# Altium PCB EMG_Arm_ELCT-V3.0.PcbDoc (part 1 of 3)
Units mil, origin at the board's own origin, x right, y up, seen from the top; angles counter-clockwise.
Board outline 8303.83 x 7532.25 mil, 2 copper layers (Top Layer, Bottom Layer), stack 3.556 mil thick; 104 components, 76 nets, 393 pads, 162 vias.
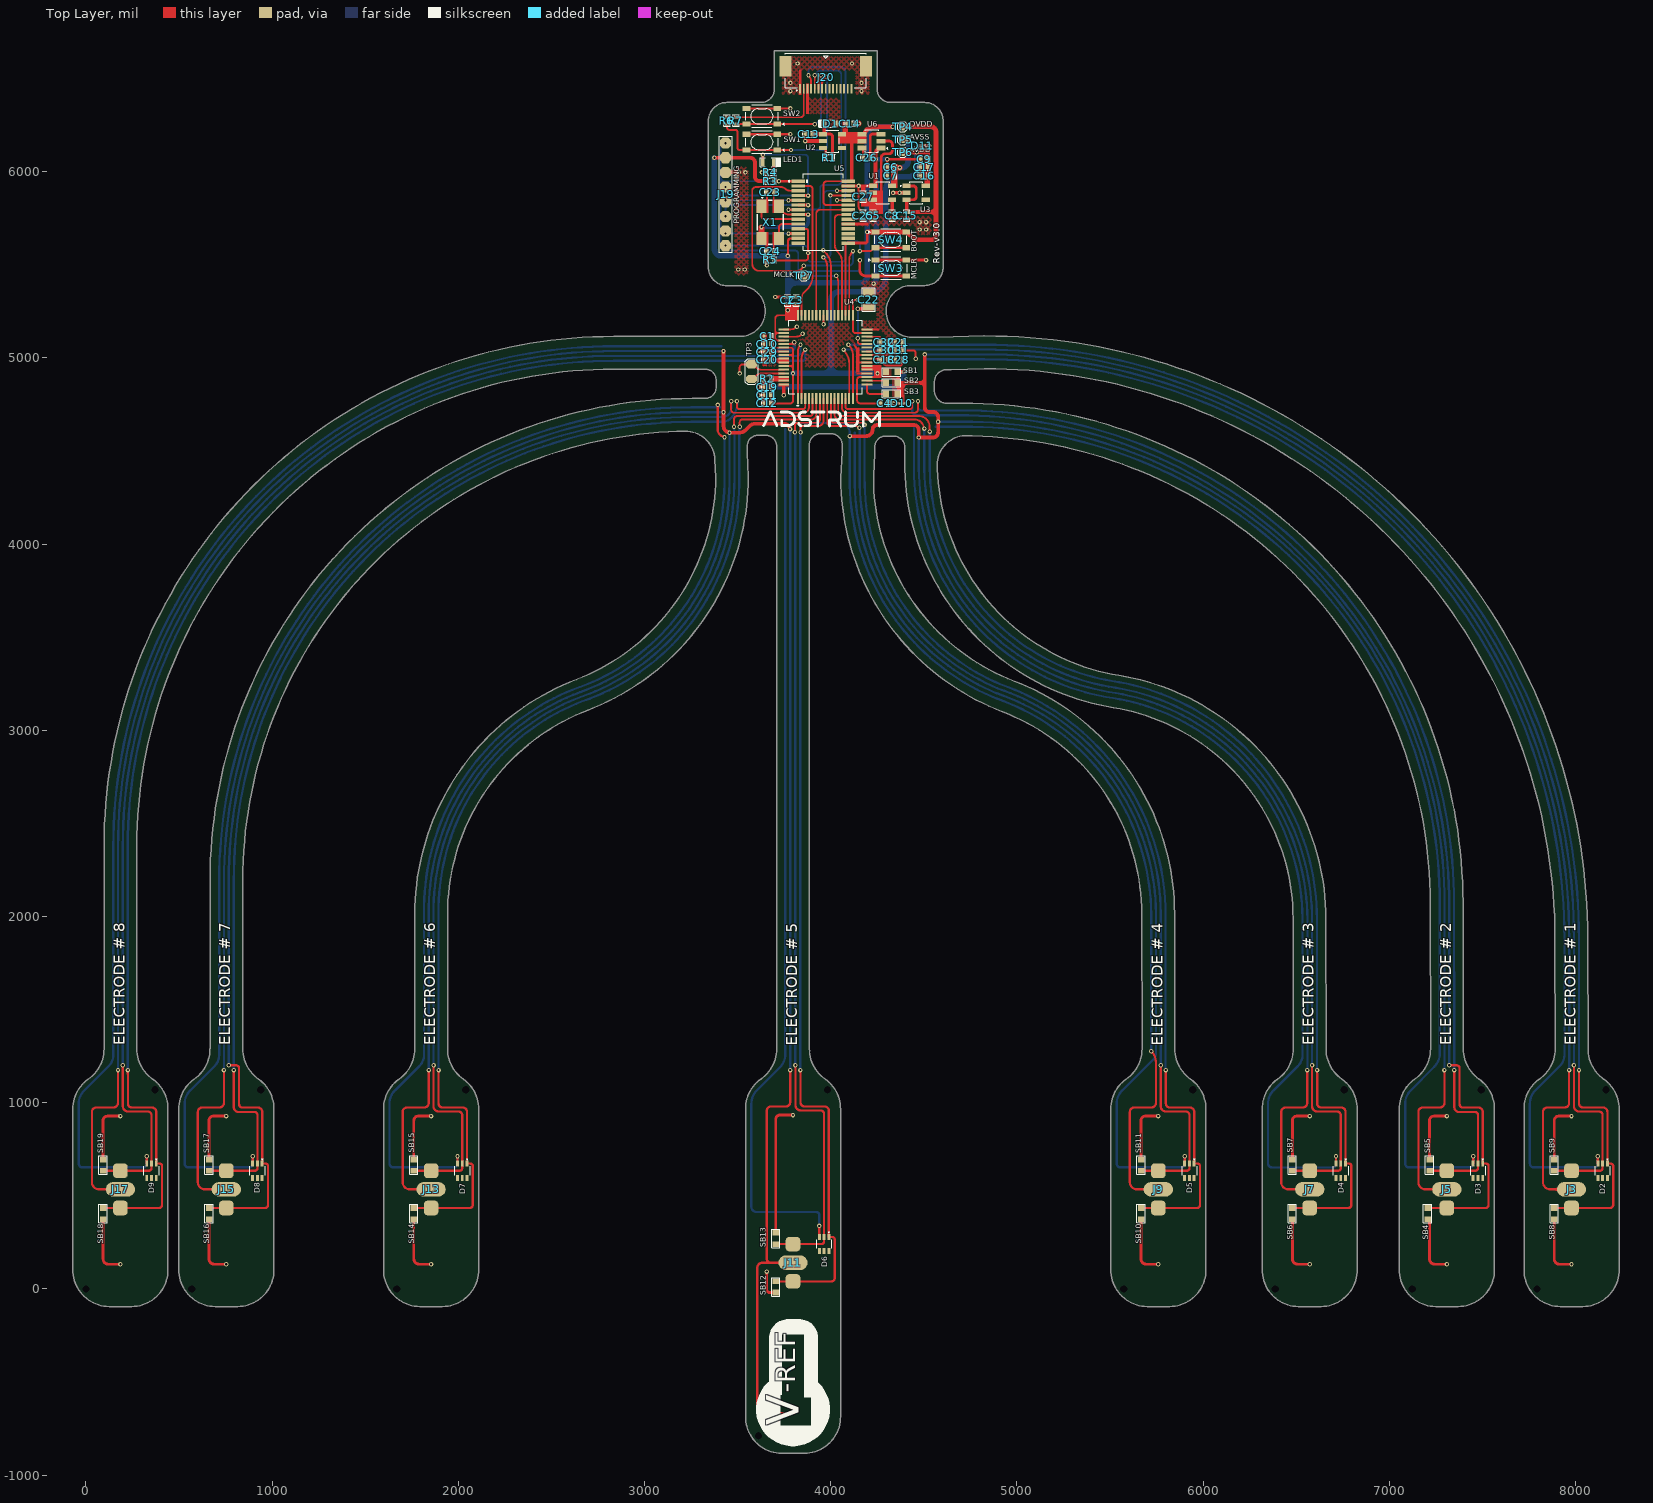
[diagram p0: Top Layer view]
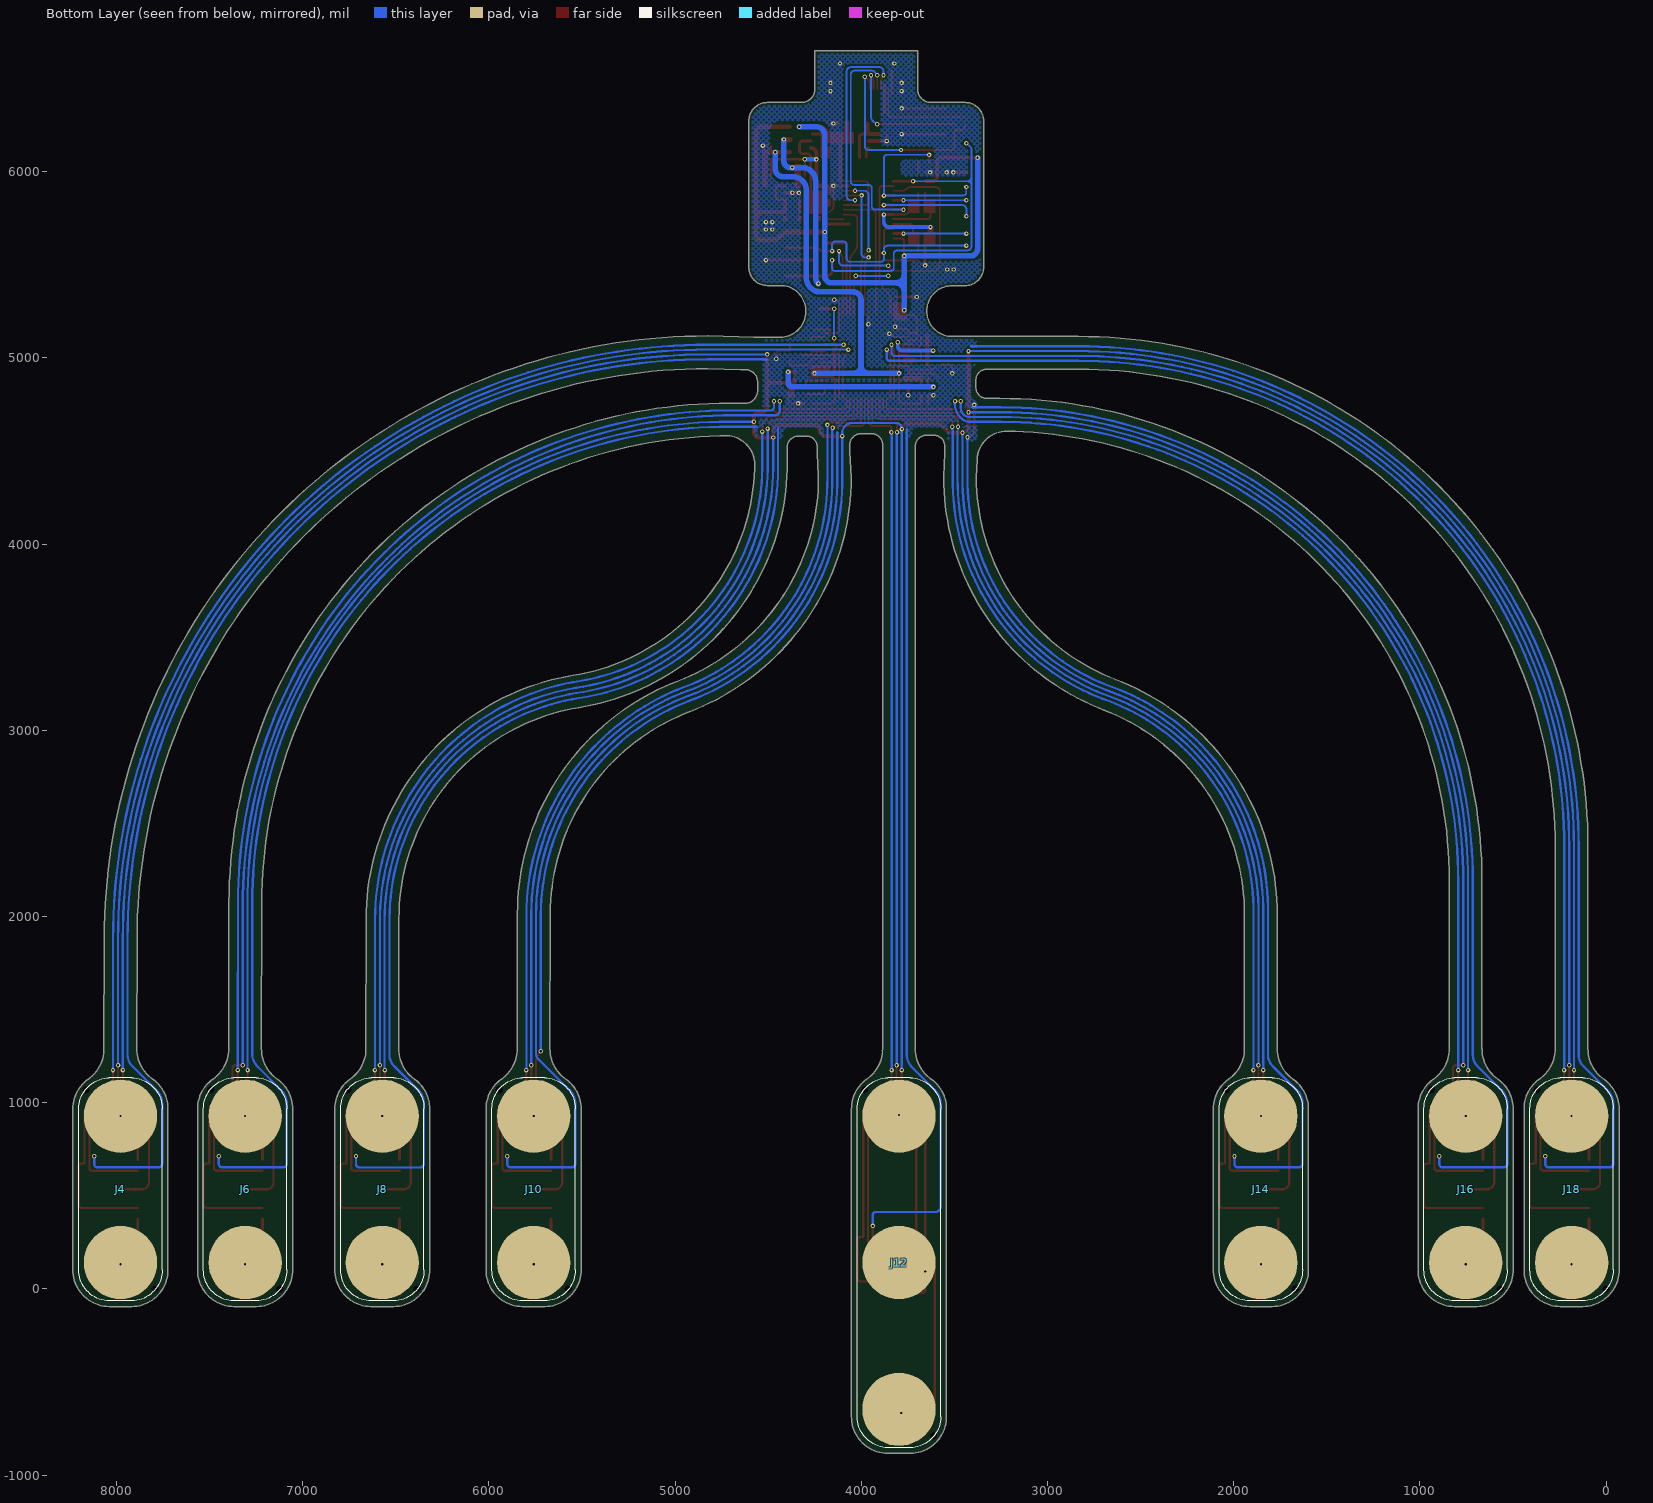
[diagram p1: Bottom Layer view, seen from below]
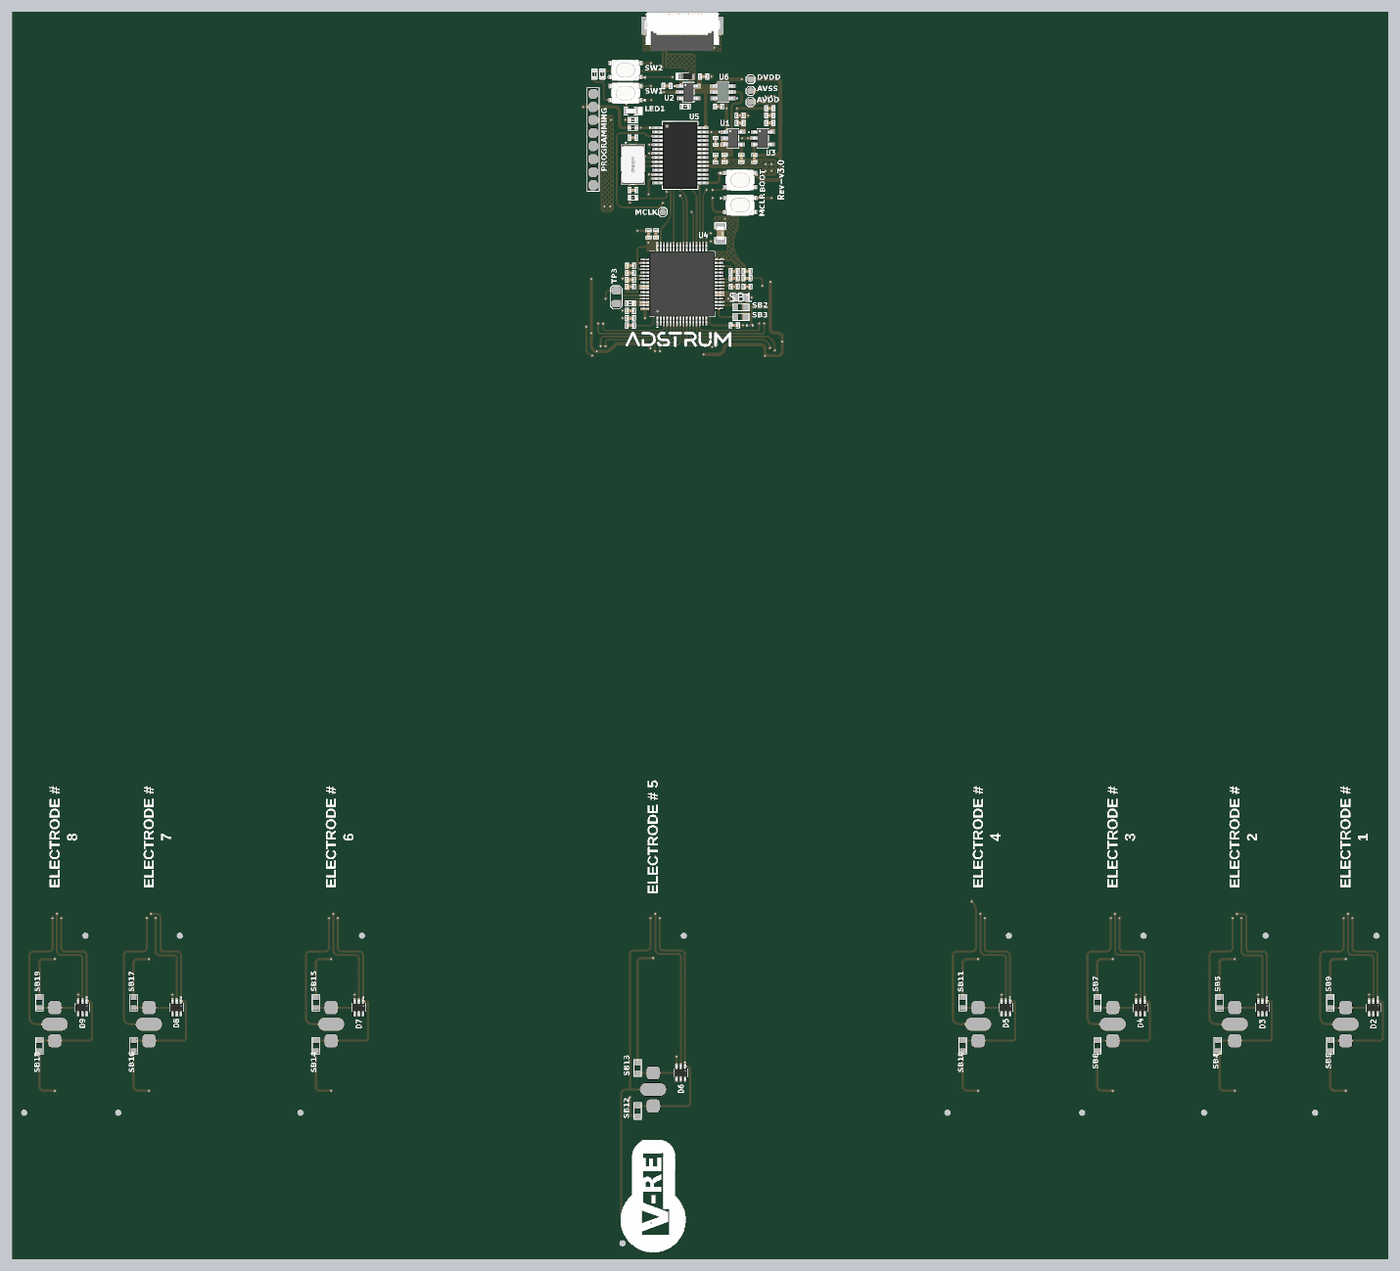
[diagram p3: 3D render of the assembled board from above, using the file's embedded part models]

## Layer stack, top to bottom
Top Solder: solder mask 0.5, Solder Resist, Dk 3.5
Top Layer: signal copper 1.378
Dielectric 1: dielectric 0.8, Flex, Dk 4.8
Bottom Layer: signal copper 1.378
Bottom Solder: solder mask 0.5, Solder Resist, Dk 3.5

## Board outline
-70,104.26 ccw(c126.84,102.05) 124.63,-94.79 245.86,-94.79 ccw(c243.65,102.05) 440.49,104.26 440.49,964.73 ccw(c243.67,966.94) 358.69,1126.66 358.63,1126.58 cw(c470.07,1288.83) 273.25,1291.04 273.24,1291.04 273.24,2378.83 cw(c2834.23,2378.83) 2834.29,4939.83 3325.21,4939.83 cw(c3325.21,4880.77) 3384.26,4880.77 3384.26,4841.93 cw(c3325.21,4841.93) 3325.21,4782.87 3255.48,4782.87 ccw(c3255.52,2193.58) 666.23,2193.58 666.23,1291.04 666.22,1291.04 cw(c469.4,1288.83) 580.84,1126.58 580.79,1126.66 ccw(c695.8,966.94) 498.98,964.73 498.98,104.27 ccw(c695.82,102.05) 693.6,-94.79 814.84,-94.79 ccw(c812.63,102.05) 1009.47,104.26 1009.46,964.73 ccw(c812.65,966.94) 927.66,1126.66 927.61,1126.58 cw(c1039.05,1288.83) 842.23,1291.04 842.22,1291.04 842.22,2193.58 cw(c3255.52,2193.58) 3128.55,4603.55 cw(c3234.74,2193.71) 3219.49,4605.84 cw(c3220.49,4448.36) 3377.84,4454.78 3381.76,4358.72 cw(c2215.67,4361.9) 2632.93,3273.02 ccw(c3116.02,2012.41) 1766.02,2012.44 1766.02,1291.04 1766,1291.04 cw(c1569.19,1288.83) 1680.63,1126.58 1680.57,1126.66 ccw(c1795.58,966.94) 1598.77,964.73 1598.76,104.27 ccw(c1795.6,102.05) 1793.39,-94.79 1914.62,-94.79 ccw(c1912.41,102.05) 2109.25,104.26 2109.25,964.73 ccw(c1912.43,966.94) 2027.45,1126.66 2027.39,1126.58 cw(c2138.83,1288.83) 1942.01,1291.04 1942,1291.04 1942,2012.44 cw(c3116.02,2012.41) 2695.9,3108.69 ccw(c2215.67,4361.9) 3557.75,4360.43 3557.75,4362.18 3552.54,4489.77 3552.13,4533.39 cw(c3610.76,4526.35) 3610.76,4585.41 3650.17,4585.41 cw(c3650.17,4526.35) 3708.8,4533.39 3709.22,4531.82 3709.22,4526.82 3709.22,4526.35 3709.22,4510.82 3709.49,1291.04 cw(c3512.67,1288.83) 3624.11,1126.58 3624.05,1126.66 ccw(c3739.07,966.94) 3542.25,964.73 3542.24,-684.15 ccw(c3739.08,-686.36) 3736.87,-883.2 3858.1,-883.2 ccw(c3855.89,-686.36) 4052.73,-684.15 4052.73,964.73 ccw(c3855.92,966.94) 3970.93,1126.66 3970.87,1126.6 cw(c4082.29,1288.82) 3885.5,1291.03 3885.21,4497.17 3885.21,4536.86 3885.63,4540.8 cw(c3944.26,4533.75) 3944.26,4592.81 4002.22,4592.81 cw(c4002.22,4533.75) 4060.85,4540.8 4060.53,4497.17 4052.73,4357.28 4052.76,4354.28 ccw(c5409.7,4366.62) 4922.45,3100.12 4922.56,3100.07 cw(c4505.83,2012.62) 5670.39,2014.6 5671.65,1291.04 cw(c5474.84,1288.83) 5586.28,1126.58 5586.22,1126.66 ccw(c5701.23,966.94) 5504.42,964.73 5504.41,104.27 ccw(c5701.25,102.05) 5699.04,-94.79 5820.27,-94.79 ccw(c5818.06,102.05) 6014.9,104.26 6014.9,964.73 ccw(c5818.08,966.94) 5933.1,1126.66 5933.04,1126.58 cw(c6044.48,1288.83) 5847.66,1291.04 5847.64,1291.04 5846.38,2014.91 ccw(c4505.83,2012.62) 4985.54,3264.41 cw(c5409.7,4366.62) 4250.32,4141.6 cw(c5418.61,4362.09) 4229.7,4362.09 4229.73,4370.52 4236.1,4484.91 4236.1,4521.26 cw(c4295.15,4521.26) 4295.15,4580.31 4338.1,4580.31 cw(c4338.1,4521.26) 4397.15,4521.26 4397.15,4477.64 4397.05,4477.64 4396.52,4440.26 ccw(c5732.96,4440.77) 5518.25,3121.69 cw(c5333.55,1987.03) 6483.14,1989.04 6484.36,1291.03 cw(c6287.55,1288.82) 6398.99,1126.58 6398.93,1126.66 ccw(c6513.95,966.93) 6317.13,964.72 6317.12,104.26 ccw(c6513.96,102.05) 6511.75,-94.79 6632.98,-94.79 ccw(c6630.77,102.05) 6827.61,104.26 6827.61,964.72 ccw(c6630.79,966.93) 6745.81,1126.66 6745.75,1126.58 cw(c6857.19,1288.82) 6660.37,1291.03 6660.35,1291.04 6659.13,1989.35 ccw(c5333.55,1987.03) 5546.52,3295.39 cw(c5732.97,4440.76) 4572.52,4440.33 cw(c4729.33,4425.89) 4706,4581.63 cw(c4706.54,2068.44) 7219.73,2072.88 7221.11,1291.04 cw(c7024.3,1288.83) 7135.74,1126.58 7135.68,1126.67 ccw(c7250.69,966.94) 7053.88,964.73 7053.87,104.27 ccw(c7250.71,102.05) 7248.5,-94.78 7369.73,-94.78 ccw(c7367.52,102.05) 7564.36,104.26 7564.36,964.73 ccw(c7367.54,966.94) 7482.56,1126.66 7482.5,1126.58 cw(c7593.94,1288.83) 7397.12,1291.04 7397.1,1291.05 7395.72,2073.19 ccw(c4706.54,2068.44) 4705.96,4757.61 4705.96,4757.63 4647.3,4756.67 4618.94,4756.67 cw(c4625.02,4824.72) 4556.7,4824.72 4556.7,4869.66 cw(c4625.02,4869.66) 4619.1,4937.72 4647.3,4937.72 4825.22,4942.26 cw(c4824.92,1877.62) 7889.55,1882.97 7890.59,1291.04 cw(c7693.77,1288.83) 7805.21,1126.58 7805.15,1126.66 ccw(c7920.17,966.94) 7723.35,964.72 7723.35,104.27 ccw(c7920.19,102.05) 7917.97,-94.79 8039.21,-94.79 ccw(c8037,102.05) 8233.83,104.26 8233.83,964.72 ccw(c8037.01,966.93) 8152.03,1126.66 8151.74,1126.74 cw(c8261.29,1286.23) 8067.9,1280.27 8065.54,1883.28 ccw(c4824.92,1877.62) 4824.02,5118.25 4822.96,5118.25 4578.3,5112.01 4434.22,5112.01 cw(c4434.22,5248.13) 4298.1,5248.13 cw(c4434.13,5253.04) 4434.13,5389.16 4474.13,5389.16 4505.79,5389.16 ccw(c4505.79,5486.35) 4574.52,5417.62 ccw(c4503.84,5488.3) 4603.79,5488.3 4603.79,6272.28 ccw(c4503.75,6272.28) 4574.49,6343.03 ccw(c4503.81,6272.35) 4503.81,6372.3 4321.09,6372.3 cw(c4321.09,6443.82) 4249.58,6443.82 4249.58,6649.05 3696.9,6649.05 3696.9,6443.82 cw(c3625.39,6443.82) 3625.39,6372.3 3442.67,6372.3 ccw(c3442.67,6272.35) 3371.99,6343.03 ccw(c3442.74,6272.28) 3342.69,6272.28 3342.69,5488.3 ccw(c3442.64,5488.3) 3371.97,5417.62 ccw(c3443.37,5489.03) 3443.37,5388.05 3512.26,5388.05 cw(c3512.26,5251.93) 3648.38,5251.93 cw(c3512.26,5251.93) 3512.26,5115.81 2834.29,5115.81 ccw(c2834.23,2378.83) 97.26,2378.83 97.25,1291.04 97.24,1291.04 cw(c-99.57,1288.83) 11.87,1126.58 11.81,1126.66 ccw(c126.82,966.94) -69.99,964.73

## Design rules (kind name [scope] priority, off if disabled: settings)
BoardOutlineClearance [All] p1: gap=0 ignorepadtopadclearanceinfootprint=FALSE except(7: Track-OutlineEdge; 10: Arc-OutlineEdge SMDPad-OutlineEdge THPad-OutlineEdge Via-OutlineEdge Fill-OutlineEdge Poly-OutlineEdge Region-OutlineEdge Text-OutlineEdge)
Clearance [All] p1: gap=7 ignorepadtopadclearanceinfootprint=FALSE except(5: SMDPad-SMDPad SMDPad-Fill; 10: Arc-Poly Track-Poly SMDPad-Poly THPad-Poly Via-Poly Fill-Poly Poly-Poly)
ComponentClearance [All] p1: gap=0 collisioncheckmode=3 verticalgap=0 showdistances=FALSE
MinimumSolderMaskSliver [All] p1: minsoldermaskwidth=0
PolygonConnect [All] p1: connectstyle=Direct reliefconductorwidth=10 reliefentries=4 polygonreliefangle="90 Angle" airgapwidth=10
RoutingVias [All] p1: holewidth=11.81 width=23.62 viastyle="Through Hole" minholewidth=7.87 minwidth=13.78 maxholewidth=31.5 maxwidth=62.99
SilkToSilkClearance [All] p1: silktosilkclearance=0
SilkToSolderMaskClearance [IsPad] p1: minsilkscreentomaskgap=0 clearancetoexposedcopper=TRUE
SolderMaskExpansion [All] p1: expansion=4 istentingtop=FALSE
SupplyNets "Schematic Supply Nets_4" [InNet('VCC_3V3')] p1: voltage=0.000
SupplyNets "Schematic Supply Nets_8" [InNet('DVDD')] p2: voltage=0.000
SupplyNets "Schematic Supply Nets_6" [InNet('+VBATT_RAW')] p3: voltage=0.000
SupplyNets "Schematic Supply Nets_5" [InNet('AGND')] p4: voltage=0.000
SupplyNets "Schematic Supply Nets_3" [InNet('-RAW')] p5: voltage=0.000
SupplyNets "Schematic Supply Nets_2" [InNet('AVDD')] p6: voltage=0.000
SupplyNets "Schematic Supply Nets_1" [InNet('AVSS')] p7: voltage=0.000
SupplyNets "Schematic Supply Nets" [InNet('VBATT')] p8: voltage=0.000
Width [All] p1: maxlimit=50 minlimit=10 preferedwidth=15 minimp=50.000000 maximp=50.000000 favimp=50.000000
26 further rules are at their usual default settings.

## Classes and differential pairs
component class Power_Sheet: C1 C2 C3 C4 C5 C6 C7 C8 C9 C10 C11 C12 C13 C14 C15 C16 C17 C26 C27 D1 D10 D11 R1 TP4 TP5 TP6 U1 U2 U3 U6
component class Pic_Sheet: C23 C24 C25 J19 J20 LED1 R3 R4 R5 R6 R7 SW1 SW2 SW3 SW4 U5 X1
component class Electrode_Sheet: D2 D3 D4 D5 D6 D7 D8 D9 J3 J4 J5 J6 J7 J8 J9 J10 J11 J12 J13 J14 J15 J16 J17 J18 SB4 SB5 SB6 SB7 SB8 SB9 SB10 SB11 SB12 SB13 SB14 SB15 SB16 SB17 SB18 SB19
component class AFE_SHEET: C18 C19 C20 C21 C22 C28 C29 C30 C31 C32 R2 SB1 SB2 SB3 TP3 TP7 U4

## Components (designator, comment, footprint, x,y, rotation, side; value= is the part's Value field where it differs from the comment)
C1 "1uF" Cap-0402 3660.21,5116.29 r0 top
C2 "0.1uF" Cap-0402 3769.38,5309.05 r270 top value=100nF
C3 "1uF" Cap-0402 3813.61,5309.05 r270 top
C4 "0.1uF" Cap-0402 4287.58,4755.86 r180 top value=100nF
C5 "2.2uF" Cap-0402 4228.79,5764.28 r270 top
C6 "10uF" Cap-0402 4322.24,6024.61 r0 top
C7 "2.2uF" Cap-0402 4322.24,5978.37 r180 top
C8 "0.01uF" Cap-0402 4330.09,5764.29 r270 top
C9 "1uF" Cap-0402 4502.23,6067.05 r0 top
C10 "0.1uF" Cap-0402 3660.21,5072.79 r0 top value=100nF
C11 "1uF" Cap-0402 3660.2,4799.56 r0 top
C12 "0.1uF" Cap-0402 3660.2,4755.56 r0 top value=100nF
C13 "2.2uF" Cap-0402 3880.74,6202.51 r180 top
C14 "2.2uF" Cap-0402 4102.26,6259.23 r0 top
C15 "2.2uF" Cap-0402 4407.71,5764.29 r270 top
C16 "2.2uF" Cap-0402 4502.23,5978.35 r180 top
C17 "10uF" Cap-0402 4502.23,6024.61 r0 top
C18 "0.1uF" Cap-0402 4286.88,4989.15 r0 top value=100nF
C19 "1nF" Cap-0402 3660.2,4843.9 r0 top
C20 "1uF" Cap-0402 3660.21,4989.5 r0 top
C21 "1uF" Cap-0402 4364.21,5083.41 r180 top
C22 "100uF" Cap-0805 4203.84,5313.68 r270 top
C23 "25pF" Cap-0402 3675.38,5889.35 r180 top
C24 "25pF" Cap-0402 3675.38,5573.05 r0 top
C25 "10uF" Cap-0402 4175.38,5764.11 r270 top
C26 "10uF" Cap-0402 4192.97,6076.61 r180 top
C27 "10uF" Cap-0402 4175.38,5867.07 r270 top
C28 "10uF" Cap-0402 4364.21,4989.38 r0 top
C29 "0.1uF" Cap-0402 3660.21,5031.38 r0 top value=100nF
C30 "1uF" Cap-0402 4286.89,5040.89 r180 top
C31 "0.1uF" Cap-0402 4364.21,5040.89 r180 top value=100nF
C32 "1uF" Cap-0402 4286.89,5083.4 r180 top
D1 "CDBU0130L" CDBU0130L-HF 3998.83,6259.23 r180 top
D2 "TPD4E1B06DCKR" SOT-363 8145.38,635 r270 top
D3 "TPD4E1B06DCKR" SOT-363 7475.9,635 r270 top
D4 "TPD4E1B06DCKR" SOT-363 6739.16,634.99 r270 top
D5 "TPD4E1B06DCKR" SOT-363 5926.45,635 r270 top
D6 "TPD4E1B06DCKR" SOT-363 3964.28,241.8 r270 top
D7 "TPD4E1B06DCKR" SOT-363 2020.8,635 r270 top
D8 "TPD4E1B06DCKR" SOT-363 921.01,635 r270 top
D9 "TPD4E1B06DCKR" SOT-363 352.03,635 r270 top
D10 "ESD451DPLR" X2SON-2(0.3x0.6) 4381.31,4755.86 r180 top
D11 "ESD451DPLR" X2SON-2(0.3x0.6) 4492.72,6140.41 r0 top
J3 "Test Pad SMD 3 Pin" "Test Pad (SMD 3 Pin)" 7978.35,535 r180 top locked
J4 "EMG ELECTRODE" "EMG 2 PAD" 7978.35,535 r0 bottom locked
J5 "Test Pad SMD 3 Pin" "Test Pad (SMD 3 Pin)" 7308.87,535 r180 top locked
J6 "EMG ELECTRODE" "EMG 2 PAD" 7308.87,535 r0 bottom locked
J7 "Test Pad SMD 3 Pin" "Test Pad (SMD 3 Pin)" 6572.12,534.99 r180 top locked
J8 "EMG ELECTRODE" "EMG 2 PAD" 6572.12,534.99 r0 bottom locked
J9 "Test Pad SMD 3 Pin" "Test Pad (SMD 3 Pin)" 5759.41,535 r180 top locked
J10 "EMG ELECTRODE" "EMG 2 PAD" 5759.41,535 r0 bottom locked
J11 "Test Pad SMD 3 Pin" "Test Pad (SMD 3 Pin)" 3797.24,140.8 r180 top locked
J12 "Electrode Pads" "EMG 3 Pad" 3797.24,140.8 r0 bottom locked
J13 "Test Pad SMD 3 Pin" "Test Pad (SMD 3 Pin)" 1853.76,535 r180 top locked
J14 "EMG ELECTRODE" "EMG 2 PAD" 1853.76,535 r0 bottom locked
J15 "Test Pad SMD 3 Pin" "Test Pad (SMD 3 Pin)" 753.98,535 r180 top locked
J16 "EMG ELECTRODE" "EMG 2 PAD" 753.98,535 r0 bottom locked
J17 "Test Pad SMD 3 Pin" "Test Pad (SMD 3 Pin)" 185,535 r180 top locked
J18 "EMG ELECTRODE" "EMG 2 PAD" 185,535 r0 bottom locked
J19 "SMD PADS (1x8) 2.54mm" "SMD PADS (1x8) 2.54mm" 3435.38,6154.27 r270 top
J20 "8.01A0.015200" 8.01A0.015200 3973.24,6506.38 r180 top locked
LED1 "150060BS75000" LED-0603 3664.35,6051.79 r0 top
R1 "10K" Res-0402 3991.38,6076.61 r180 top
R2 "1M" Res-0402 3660.21,4888.78 r0 top value=1MR
R3 "470K" Res-0402 3675.37,5950.05 r180 top value=470kR
R4 "1K" Res-0402 3675.38,5996.68 r0 top
R5 "470K" Res-0402 3675.38,5528.09 r0 top value=470kR
R6 "10K" Res-0402 3442.67,6274.52 r90 top
R7 "10K" Res-0402 3490.38,6274.52 r90 top
SB1 "Solder Bridge 0603" "Solder Bridge" 4326.58,4924.78 r0 top
SB2 "Solder Bridge 0603" "Solder Bridge" 4326.58,4866.24 r180 top
SB3 "Solder Bridge 0603" "Solder Bridge" 4326.58,4807.19 r180 top
SB4 "Solder Bridge 0603" "Solder Bridge" 7205.38,405 r90 top
SB5 "Solder Bridge 0603" "Solder Bridge" 7215.9,665 r270 top
SB6 "Solder Bridge 0603" "Solder Bridge" 6479.16,404.99 r90 top
SB7 "Solder Bridge 0603" "Solder Bridge" 6479.16,664.99 r270 top
SB8 "Solder Bridge 0603" "Solder Bridge" 7885.38,405 r90 top
SB9 "Solder Bridge 0603" "Solder Bridge" 7885.38,665 r270 top
SB10 "Solder Bridge 0603" "Solder Bridge" 5666.45,405 r90 top
SB11 "Solder Bridge 0603" "Solder Bridge" 5666.45,665 r270 top
SB12 "Solder Bridge 0603" "Solder Bridge" 3704.28,10.8 r90 top
SB13 "Solder Bridge 0603" "Solder Bridge" 3704.28,270.8 r270 top
SB14 "Solder Bridge 0603" "Solder Bridge" 1760.8,405 r90 top
SB15 "Solder Bridge 0603" "Solder Bridge" 1760.8,665 r270 top
SB16 "Solder Bridge 0603" "Solder Bridge" 661.01,405 r90 top
SB17 "Solder Bridge 0603" "Solder Bridge" 661.01,665 r270 top
SB18 "Solder Bridge 0603" "Solder Bridge" 92.03,405 r90 top
SB19 "Solder Bridge 0603" "Solder Bridge" 92.03,665 r270 top
SW1 "PTS810SJK250SMTRLFS" "PTS810SJK250SMTR LFS" 3630.38,6159.27 r180 top
SW2 "PTS810SJK250SMTRLFS" "PTS810SJK250SMTR LFS" 3630.38,6298.05 r180 top
SW3 "PTS810SJK250SMTRLFS" "PTS810SJK250SMTR LFS" 4323.18,5483.05 r0 top
SW4 "PTS810SJK250SMTRLFS" "PTS810SJK250SMTR LFS" 4322.79,5634.02 r0 top
TP3 "2 Test Pad" "2 Test Pad" 3574.22,4887.13 r90 top
TP4 "TEST POINT 0.5mm Dia" "Test-point - 0.5mm" 4385.38,6242.31 r90 top
TP5 "TEST POINT 0.5mm Dia" "Test-point - 0.5mm" 4385.38,6173.05 r90 top
TP6 "TEST POINT 0.5mm Dia" "Test-point - 0.5mm" 4385.38,6104.88 r90 top
TP7 "TEST POINT 0.5mm Dia" "Test-point - 0.5mm" 3855.38,5441.05 r90 top
U1 "TPS72325DBVR" SOT-23-5 4278.9,5886.79 r0 top
U2 "MCP1754T-3302E/OT" SOT-23-5 4009.89,6165.11 r0 top
U3 "TLV70025QDDCRQ1" SOT-23-5 4458.89,5886.79 r0 top
U4 "ADS1299IPAG" "64-TQFP (10x10)" 3971.26,5005.85 r90 top locked
U5 "PIC32MX250F128B-I/SS" SSOP-28-208mil 3960.38,5783.05 r0 top
U6 "LM2664M6/NOPB" SOT-23-6 4218.97,6165.05 r180 top
X1 "8MHz" SMD6035-4P 3675.38,5727.93 r270 top

## Footprints (in the part's own frame and the unit in brackets; to place one, negate y for a bottom-side part, rotate by r counter-clockwise, add the part's x,y. Pads: shape width x height; smd on the part's side, far side on the other; paste and mask are expansions set on the pad)
"2 Test Pad" [mil]
  oct 45x60 smd: 1(0,0) 2(78.74,0)
  silkscreen extent -29,-36 108,36
8.01A0.015200 [mm]
  rect 0.25x1.3 smd paste+0 mask+0.05: 1(3.5,1.54) 2(3,1.54) 3(2.5,1.54) 4(2,1.54) 5(1.5,1.54) 6(1,1.54) 7(0.5,1.54) 8(0,1.54) 9(-0.5,1.54) 10(-1,1.54) 11(-1.5,1.54) 12(-2,1.54) 13(-2.5,1.54) 14(-3,1.54) 15(-3.5,1.54)
  rect 1.6x2.8 smd paste+0 mask+0.05: MP1(-5.5,-1.54) MP2(5.5,-1.54)
  silkscreen extent -5.55,-3.33 5.55,1.86, body extent -5.8,-3.58 5.8,2.32, height 2.02
"64-TQFP (10x10)" [mm]
  rect 1.47x0.28 smd: 1(-5.67,3.75) 2(-5.67,3.25) 3(-5.67,2.75) 4(-5.67,2.25) 5(-5.67,1.75) 6(-5.67,1.25) 7(-5.67,0.75) 8(-5.67,0.25) 9(-5.67,-0.25) 10(-5.67,-0.75) 11(-5.67,-1.25) 12(-5.67,-1.75) 13(-5.67,-2.25) 14(-5.67,-2.75) 15(-5.67,-3.25) 16(-5.67,-3.75) 33(5.67,-3.75) 34(5.67,-3.25) 35(5.67,-2.75) 36(5.67,-2.25) 37(5.67,-1.75) 38(5.67,-1.25) 39(5.67,-0.75) 40(5.67,-0.25) 41(5.67,0.25) 42(5.67,0.75) 43(5.67,1.25) 44(5.67,1.75) 45(5.67,2.25) 46(5.67,2.75) 47(5.67,3.25) 48(5.67,3.75)
  rect 0.28x1.47 smd: 17(-3.75,-5.67) 18(-3.25,-5.67) 19(-2.75,-5.67) 20(-2.25,-5.67) 21(-1.75,-5.67) 22(-1.25,-5.67) 23(-0.75,-5.67) 24(-0.25,-5.67) 25(0.25,-5.67) 26(0.75,-5.67) 27(1.25,-5.67) 28(1.75,-5.67) 29(2.25,-5.67) 30(2.75,-5.67) 31(3.25,-5.67) 32(3.75,-5.67) 49(3.75,5.67) 50(3.25,5.67) 51(2.75,5.67) 52(2.25,5.67) 53(1.75,5.67) 54(1.25,5.67) 55(0.75,5.67) 56(0.25,5.67) 57(-0.25,5.67) 58(-0.75,5.67) 59(-1.25,5.67) 60(-1.75,5.67) 61(-2.25,5.67) 62(-2.75,5.67) 63(-3.25,5.67) 64(-3.75,5.67)
  silkscreen extent -6.68,-5 5,5, body extent -5.99,-5.99 5.99,5.99, height 1.2
Cap-0402 [mil]
  rect 18x25 smd mask+2.36: 1(-18.5,0) 2(18.5,0)
  silkscreen extent -31,-16 31,16, body extent -20,-10 20,10, height 19
Cap-0805 [mil] "SMD 0805"
  rect 40x60 smd mask+2.76: 1(-40,0) 2(40,0)
  silkscreen extent -64,-34 64,34, body extent -39,-25 39,25, height 30
CDBU0130L-HF [mm]
  rect 0.6x0.8 smd: 1(-0.85,0) 2(0.85,0)
  silkscreen extent -0.3,-0.51 1.68,0.51, body extent -0.85,-0.45 0.85,0.45, height 0.78
"EMG 2 PAD" [mm]
  round 10 smd: 1(0,-9.987) 2(0,9.987)
  silkscreen extent -5.68,-15.21 5.68,15.21
"EMG 3 Pad" [mm]
  round 10 smd: 1(0,-20) 2(0,-0.026) 3(0,20)
  silkscreen extent -5.68,-25.23 5.68,25.23
LED-0603 [mm]
  rect 0.5x1 smd: 1(-0.75,0) 2(0.75,0)
  silkscreen extent -1.12,-0.66 1.75,0.66, body extent -0.82,-0.37 0.82,0.36, height 0.68
"PTS810SJK250SMTR LFS" [mm]
  rect 1.05x0.7 smd: 1(-2.1,1.075) 2(2.1,1.075) 3(-2.1,-1.075) 4(2.1,-1.075)
  silkscreen extent -3.01,-1.55 2.2,1.52, body extent -2.35,-1.6 2.35,1.6, height 2.51
Res-0402 [mil]
  rect 18x25 smd mask+2.17: 1(-18.5,0) 2(18.5,0)
  silkscreen extent -32,-17 32,16, body extent -23,-11 23,11, height 16
SMD6035-4P [mm]
  rect 1.8x1.4 smd: 1(-2.2,-1.2) 2(2.2,-1.2) 3(2.2,1.2) 4(-2.2,1.2)
  silkscreen extent -3.4,-1.8 3,1.8, body extent -3,-1.8 3,1.8, height 1.2
"SMD PADS (1x8) 2.54mm" [mil]
  oct 60x60 smd: 1(0,0) 2(78.74,0) 3(157.48,0) 4(236.22,0) 5(314.96,0) 6(393.7,0) 7(472.44,0) 8(551.18,0)
  silkscreen extent -36,-36 588,36
"Solder Bridge" [mil] "Solder Bridge ON"
  rect 30x35 smd: 1(-30,0) 2(30,0)
  silkscreen extent -50,-22 50,22
SOT-23-5 [mm]
  rect 1.1x0.6 smd: 1(-1.3,0.95) 2(-1.3,0) 3(-1.3,-0.95) 4(1.3,-0.95) 5(1.3,0.95)
  silkscreen extent -2.13,-1.5 0.88,1.5, body extent -1.4,-1.45 1.4,1.45, height 1.45
SOT-23-6 [mm]
  rect 1.22x0.62 smd: 1(-1.31,0.95) 2(-1.31,0) 3(-1.31,-0.95) 4(1.31,-0.95) 5(1.31,0) 6(1.31,0.95)
  silkscreen extent -2.18,-1.52 0.86,1.52, body extent -1.5,-1.5 1.5,1.5, height 1.47
SOT-363 [mm]
  rect 0.8x0.4 smd: 1(-0.97,0.65) 2(-0.97,0) 3(-0.97,-0.65) 4(0.97,-0.65) 5(0.97,0) 6(0.97,0.65)
  silkscreen extent -1.65,-1.07 0.6,1.07, body extent -1.15,-1.05 1.15,1.05, height 1
SSOP-28-208mil [mm]
  rect 1.85x0.45 smd: 1(-3.4,4.225) 2(-3.4,3.575) 3(-3.4,2.925) 4(-3.4,2.275) 5(-3.4,1.625) 6(-3.4,0.975) 7(-3.4,0.325) 8(-3.4,-0.325) 9(-3.4,-0.975) 10(-3.4,-1.625) 11(-3.4,-2.275) 12(-3.4,-2.925) 13(-3.4,-3.575) 14(-3.4,-4.225) 15(3.4,-4.225) 16(3.4,-3.575) 17(3.4,-2.925) 18(3.4,-2.275) 19(3.4,-1.625) 20(3.4,-0.975) 21(3.4,-0.325) 22(3.4,0.325) 23(3.4,0.975) 24(3.4,1.625) 25(3.4,2.275) 26(3.4,2.925) 27(3.4,3.575) 28(3.4,4.225)
  silkscreen extent -4.7,-5.21 2.72,5.21, body extent -3.88,-5.17 3.88,5.17, height 2.15
"Test Pad (SMD 3 Pin)" [mm]
  rrect50% 2x2 smd: 1(0,2.54) 3(0,-2.54)
  oval 4x2 smd: 2(0,0)
"Test-point - 0.5mm" [mm]
  oct 1x1 smd: 1(0,0)
  silkscreen extent -0.68,-0.68 0.68,0.68
X2SON-2(0.3x0.6) [mm]
  rect 0.28x0.25 smd paste+0 mask+0.05: 1(-0.22,0) 2(0.22,0)
  silkscreen extent -0.46,-0.15 0.46,0.13, body extent -0.3,-0.15 0.3,0.15, height 0.32

## Part data
C1 C3 C9 C11 C20 C21 C30 C32: library part CC0402KRX5R8BB105, "CAP CER 1UF 25V X5R 0402", Case Code (Imperial)=0402, Case Code (Metric)=1005, Dielectric=X5R, LCSC Part Number=C326568, Manufacturer=Yageo, Max Operating Temperature=85°C, Min Operating Temperature=-55°C, Package Quantity=10000, Supplier Part Number 1=603-CC402KRX5R8BB105, Tolerance=10%, Voltage Rating=25V, Capacitance=1uF, Case/Package=0402, Category="Ceramic Capacitors", ComponentLink1Description=http://www.mouser.com/ds/2/447/Yageo_UPY-GP_NP0_16V-to-50V_9-358835.pdf?src-supplier=Mouser, ComponentLink1URL=http://www.mouser.com/ds/2/447/Yageo_UPY-GP_NP0_16V-to-50V_9-358835.pdf?src-supplier=Mouser, ComponentLink2Description=http://www.yageo.com/documents/recent/UPY-GPHC_X5R_4V-to-50V_25.pdf?src-supplier=Digi-Key, ComponentLink2URL=http://www.yageo.com/documents/recent/UPY-GPHC_X5R_4V-to-50V_25.pdf?src-supplier=Digi-Key, ComponentLink3Description=https://4donline.ihs.com/images/VipMasterIC/IC/YAGO/YAGO-S-A0006851646/YAGO-S-A0006851646-1.pdf?hkey=6D3A4C79FDBF58556ACFDE234799DDF0&src-supplier=Newark, ComponentLink3URL=https://4donline.ihs.com/images/VipMasterIC/IC/YAGO/YAGO-S-A0006851646/YAGO-S-A0006851646-1.pdf?hkey=6D3A4C79FDBF58556ACFDE234799DDF0&src-supplier=Newark, Halogen Free="Halogen Free", Lead Free="Lead Free", Length=0.039inch, Manufacturer Part Number=CC0402KRX5R8BB105, Mount="Surface Mount", Packaging="Tape and Reel", Pricing 1="1=0.30000, 10=0.20400, 50=0.20400, 100=0.11600, 1000=0.07200, 10000=0.05900 (USD)", RoHS=Yes, RoHS Compliant=Yes, Stock 1=91975, Supplier 1=Mouser, Termination=SMD/SMT, Thickness=0.022inch, Voltage Rating (DC)=25V, Weight=2.3E-05oz, Width=0.02inch
C2 C4 C10 C12 C18 C29 C31: library part CC0402KRX7R7BB104, "CAP CER 0.1UF 16V X7R 0402", Case Code (Imperial)=0402, Case Code (Metric)=1005, Dielectric=X7R, LCSC Part Number=C60474, Manufacturer=Yageo, Max Operating Temperature=125°C, Min Operating Temperature=-55°C, Package Quantity=1, Temperature Coefficient=30ppm/°C, Tolerance=10%, Voltage=16V, Case/Package=0402, ComponentLink1Description=https://datasheet.ciiva.com/11788/0900766b80ce67ed-11788364.pdf?src-supplier=Rs, ComponentLink1URL=https://datasheet.ciiva.com/11788/0900766b80ce67ed-11788364.pdf?src-supplier=Rs, ComponentLink2Description=https://datasheet.ciiva.com/7978/1489800-7978111.pdf?src-supplier=Element14, ComponentLink2URL=https://datasheet.ciiva.com/7978/1489800-7978111.pdf?src-supplier=Element14, ComponentLink3Description=https://datasheet.ciiva.com/161/mlccorderingcode-161545.pdf?src-supplier=Digikey, ComponentLink3URL=https://datasheet.ciiva.com/161/mlccorderingcode-161545.pdf?src-supplier=Digikey, ComponentLink4Description=https://datasheet.ciiva.com/161/mlccorderingcode-161544.pdf?src-supplier=Digikey, ComponentLink4URL=https://datasheet.ciiva.com/161/mlccorderingcode-161544.pdf?src-supplier=Digikey, ComponentLink5Description=https://datasheet.ciiva.com/161/mlccorderingcode-161546.pdf?src-supplier=Digikey, ComponentLink5URL=https://datasheet.ciiva.com/161/mlccorderingcode-161546.pdf?src-supplier=Digikey, ComponentLink6Description=https://datasheet.ciiva.com/8033/1734573-8033661.pdf?src-supplier=Element14, ComponentLink6URL=https://datasheet.ciiva.com/8033/1734573-8033661.pdf?src-supplier=Element14, ComponentLink7Description=https://datasheet.ciiva.com/28450/1489800-28450335.pdf?src-supplier=Element14, ComponentLink7URL=https://datasheet.ciiva.com/28450/1489800-28450335.pdf?src-supplier=Element14, ComponentLink8Description=https://datasheet.ciiva.com/13395/upy-gphc-x7r-6-3v-to-50v-8-13395676.pdf?src-supplier=Mouser, ComponentLink8URL=https://datasheet.ciiva.com/13395/upy-gphc-x7r-6-3v-to-50v-8-13395676.pdf?src-supplier=Mouser, ComponentLink9Description=https://datasheet.ciiva.com/8033/1734573-8033663.pdf?src-supplier=Element14, ComponentLink9URL=https://datasheet.ciiva.com/8033/1734573-8033663.pdf?src-supplier=Element14, ComponentLink10Description=https://datasheet.ciiva.com/11587/upy-gphc-x7r-6-3v-to-50v-8-11587305.pdf?src-supplier=Avnet, ComponentLink10URL=https://datasheet.ciiva.com/11587/upy-gphc-x7r-6-3v-to-50v-8-11587305.pdf?src-supplier=Avnet, Depth=0.5mm, Halogen Free=5694HalogenFree, Height=0.5mm, Item Type=Capacitors, Lead Free=5697LeadFree, Length=1mm, Manufacturer Part Number=CC0402KRX7R7BB104, Material=4241ConductorMaterial, Mounting Technology="Surface Mount", Packaging="Tape and Reel", Pins=2, Pricing="10000=0.0021, 40000=0.002, 150000=0.0019, 250000=0.0019, 500000=0.0018 (USD)", Radiation Hardening=No, Reach SVHC Compliant=No, RoHS=Yes, RoHS Compliant=Yes, Series=CC, Stock=22130000, Supplier="Future Electronics", Termination=SMD/SMT, Thickness=0.022inch, Voltage Rating=16V, Voltage Rating (AC)=16V, Voltage Rating (DC)=16V, Width=0.02inch
C5 C7 C13 C14 C15 C16: library part C1005X5R1V225K050BC, "CAP CER 2.2UF 35V X5R 0402", Case Code (Imperial)=0402, Case Code (Metric)=1005, Dielectric=X5R, Dielectric Material=Ceramic, Manufacturer=TDK, Max Operating Temperature=85°C, Min Operating Temperature=-55°C, Package Quantity=1, Supplier Part Number=445-9028-1-ND, Tolerance=10%, Voltage Rating=35V, Case/Package=0402, ComponentLink1Description=https://datasheet.ciiva.com/24218/mlcc-commercial-general-en-24218938.pdf?src-supplier=Mouser, ComponentLink1URL=https://datasheet.ciiva.com/24218/mlcc-commercial-general-en-24218938.pdf?src-supplier=Mouser, Depth=0.5mm, Height=0.5mm, Item Type=Capacitors, Lead Free="Lead Free", Length=1mm, Manufacturer Part Number=C1005X5R1V225K050BC, Material=4241ConductorMaterial, Mounting Technology="Surface Mount", Packaging="Tape and Reel", Pricing="1=0.21, 10=0.123, 50=0.0866, 100=0.0754, 500=0.05646, 1000=0.05055, 2500=0.04429, 5000=0.04049 (USD)", Reach SVHC Compliant=Unknown, RoHS=Yes, RoHS Compliant=Yes, Series=C, Stock=1458755, Supplier=Digikey, Termination=SMD/SMT, Thickness=0.022inch, Voltage Rating (DC)=35V, Weight=2.3E-05oz, Width=0.02inch
C6 C17: library part CC0402MRX5R6BB106, "CAP CER 10UF 10V X5R 0402", Case Code (Imperial)=0402, Case Code (Metric)=1005, LCSC Part Number=C962143, Manufacturer=Yageo, Max Operating Temperature=85°C, Min Operating Temperature=-55°C, Supplier Part Number 1=6097631, Tolerance=20%, Voltage Rating=10V, Capacitance=10uF, Case/Package=0402, Category="Ceramic Capacitors", ComponentLink1Description=http://www.yageo.com/documents/recent/UPY-GPHC_X5R_4V-to-50V_25.pdf?src-supplier=Digi-Key, ComponentLink1URL=http://www.yageo.com/documents/recent/UPY-GPHC_X5R_4V-to-50V_25.pdf?src-supplier=Digi-Key, Item Type=Capacitor, Manufacturer Part Number=CC0402MRX5R6BB106, Mount="Surface Mount", Packaging="Tape and Reel", Pricing 1="10000=0.02650, 20000=0.02590, 30000=0.02550, 40000=0.02530, 50000=0.02450 (USD)", RoHS=Yes, RoHS Compliant=Yes, Stock 1=80000, Supplier 1="Future Electronics"
C8: library part CC0402KRX5R8BB103, "CAP CER 10000PF 25V X5R 0402", LCSC Part Number=C576726, Manufacturer=Yageo, Supplier Part Number 1=2101932, Category="Ceramic Capacitors", ComponentLink1Description=LCSC, ComponentLink1URL=https://www.lcsc.com/product-detail/Multilayer-Ceramic-Capacitors-MLCC-SMD-SMT_YAGEO-CC0402KRX5R8BB103_C576726.html, Item Type=Capacitor, Manufacturer Part Number=CC0402KRX5R8BB103, Pricing 1="10000=0.00290, 40000=0.00270, 150000=0.00260, 250000=0.00250, 500000=0.00240 (USD)", RoHS=Yes, RoHS Compliant=Yes, Stock 1=140000, Supplier 1="Future Electronics"
C19: library part CC0402KRX7R8BB102, "CAP CER 1000PF 25V X7R 0402", Case Code (Imperial)=0402, Case Code (Metric)=1005, Dielectric=X7R, Insulation Resistance=10GR, LCSC Part Number=C541372, Manufacturer=Yageo, Max Operating Temperature=125°C, Min Operating Temperature=-55°C, Tolerance=10%, Voltage Rating=25V, Capacitance=1nF, Case/Package=0402, Category="Ceramic Capacitors", ComponentLink1Description=https://datasheet.ciiva.com/26862/getdatasheetpartid-639817-26862638.pdf?src-supplier=Verical, ComponentLink1URL=https://datasheet.ciiva.com/26862/getdatasheetpartid-639817-26862638.pdf?src-supplier=Verical, ComponentLink2Description=https://datasheet.ciiva.com/5425/upy-gp-np0-16v-to-50v-8-3714-5425527.pdf?src-supplier=Mouser, ComponentLink2URL=https://datasheet.ciiva.com/5425/upy-gp-np0-16v-to-50v-8-3714-5425527.pdf?src-supplier=Mouser, Depth=0.5mm, Dissipation Factor=2.5%, Halogen Free="Halogen Free", Item Type=Capacitor, Lead Free="Lead Free", Length=1mm, Manufacturer Part Number=CC0402KRX7R8BB102, Mount="Surface Mount", Number of Pins=2, Packaging="Tape and Reel", Pricing 1="1=0.00230, 10000=0.00230, 100001=0.00190 (USD)", Radiation Hardening=No, RoHS=Yes, RoHS Compliant=Yes, Series=CC, Stock 1=370000, Supplier 1="Arrow Electronics", Supplier Part Number 1=CC0402KRX7R8BB102, Termination=SMD/SMT, Thickness=0.022inch, Voltage Rating (DC)=25V, Width=0.02inch
C22: library part GRM21BR60J107ME15L, "CAP CER 100UF 6.3V X5R 0805", Case Code (Imperial)=0805, Case Code (Metric)=2012, Dielectric=X5R, LCSC Part Number=C141660, Manufacturer=Murata, Max Operating Temperature=85°C, Min Operating Temperature=-55°C, Tolerance=20%, Voltage Rating=6.3V, Case/Package=0805, ComponentLink1Description=http://www.farnell.com/datasheets/1957830.pdf?src-supplier=Farnell, ComponentLink1URL=http://www.farnell.com/datasheets/1957830.pdf?src-supplier=Farnell, ComponentLink2Description=https://datasheet.octopart.com/GRM21BR60J107ME15L-Murata-datasheet-48012791.pdf?src-supplier=Element14, ComponentLink2URL=https://datasheet.octopart.com/GRM21BR60J107ME15L-Murata-datasheet-48012791.pdf?src-supplier=Element14, ComponentLink3Description=http://www.farnell.com/datasheets/1957830.pdf?src-supplier=Element14, ComponentLink3URL=http://www.farnell.com/datasheets/1957830.pdf?src-supplier=Element14, ComponentLink4Description=https://search.murata.co.jp/Ceramy/image/img/A01X/G101/ENG/GRM21BR60J107ME15-01.pdf?src-supplier=Digikey, ComponentLink4URL=https://search.murata.co.jp/Ceramy/image/img/A01X/G101/ENG/GRM21BR60J107ME15-01.pdf?src-supplier=Digikey, ComponentLink5Description=https://datasheet.octopart.com/GRM21BR60J107ME15L-Murata-datasheet-62287462.pdf?src-supplier=Future+Electronics, ComponentLink5URL=https://datasheet.octopart.com/GRM21BR60J107ME15L-Murata-datasheet-62287462.pdf?src-supplier=Future+Electronics, ComponentLink6Description=http://www.farnell.com/datasheets/1957830.pdf?src-supplier=Newark, ComponentLink6URL=http://www.farnell.com/datasheets/1957830.pdf?src-supplier=Newark, ComponentLink7Description=https://datasheet.octopart.com/GRM21BR60J107ME15L-Murata-datasheet-165579666.pdf?src-supplier=TME, ComponentLink7URL=https://datasheet.octopart.com/GRM21BR60J107ME15L-Murata-datasheet-165579666.pdf?src-supplier=TME, Height=1.45mm, Item Type=Capacitors, Lead Free="Lead Free", Length=0.079inch, Manufacturer Part Number=GRM21BR60J107ME15L, Material=4241ConductorMaterial, Mounting Technology="Surface Mount", Packaging="Cut Tape", Pricing="1=1.28, 10=0.697, 50=0.697, 100=0.633, 1000=0.485, 10000=0.384 (USD)", Reach SVHC Compliant=No, RoHS=Yes, RoHS Compliant=Yes, Series=GRM, Stock=94172, Supplier=Mouser, Thickness=0.057inch, Voltage Rating (DC)=6.3V, Width=0.049inch
C23 C24: library part CC0402JRNPO9BN250, "CAP CER 25PF 50V C0G/NPO 0402", Case/Package=0402, LCSC Part Number=C541363, Manufacturer=Yageo, Item Type=Capacitors, Manufacturer Part Number=CC0402JRNPO9BN250, Pricing="1=0.1, 10=0.02, 50=0.02, 100=0.012, 1000=0.01, 10000=0.007 (USD)", RoHS=Yes, Stock=230189, Supplier=Mouser
C25 C26 C27 C28: library part CL05A106MP5NUNC, "CAP CER 10UF 10V X5R 0402", Case Code (Imperial)=0402, Case Code (Metric)=1005, Dielectric=X5R, LCSC Part Number=C315248, Manufacturer=Samsung, Max Operating Temperature=85°C, Min Operating Temperature=-55°C, Package Quantity=1, Tolerance=20%, Voltage Rating=10V, Capacitance=10uF, Case/Package=0402, Category="Ceramic Capacitors", ComponentLink1Description=https://datasheet.ciiva.com/25721/cl05a106mp5nunc-25721584.pdf?src-supplier=Digi-Key, ComponentLink1URL=https://datasheet.ciiva.com/25721/cl05a106mp5nunc-25721584.pdf?src-supplier=Digi-Key, ComponentLink2Description=https://datasheet.ciiva.com/26838/getdatasheetpartid-745310-26838170.pdf?src-supplier=Verical, ComponentLink2URL=https://datasheet.ciiva.com/26838/getdatasheetpartid-745310-26838170.pdf?src-supplier=Verical, Construction=Flat, Contact Plating=Tin, Depth=0.5mm, Item Type=Capacitor, Lead Free="Lead Free", Length=1mm, Manufacturer Part Number=CL05A106MP5NUNC, Mount="Surface Mount", Packaging="Tape and Reel", Pricing 1="10000=0.02537 (USD)", Radiation Hardening=No, RoHS=Yes, RoHS Compliant=Yes, Series=CL, Stock 1=1729850, Supplier 1=Avnet, Supplier Part Number 1=CL05A106MP5NUNC, Termination=Wraparound, Thickness=0.028inch, Width=0.02inch
D1: "DIODE SCHOTTKY 30V 100MA 0603C", LCSC Part Number=C2886023, Manufacturer=Comchip, ComponentLink1Description=https://datasheet.ciiva.com/4716/cdbu0130l-reva791956-41311-4716064.pdf?src-supplier=Mouser, ComponentLink1URL=https://datasheet.ciiva.com/4716/cdbu0130l-reva791956-41311-4716064.pdf?src-supplier=Mouser, ComponentLink2Description=https://datasheet.ciiva.com/912/cdbu0130l-reva791956-912529.pdf?src-supplier=Digikey, ComponentLink2URL=https://datasheet.ciiva.com/912/cdbu0130l-reva791956-912529.pdf?src-supplier=Digikey, ComponentLink3Description=https://datasheet.ciiva.com/912/cdbu0130l-reva791956-912530.pdf?src-supplier=Digikey, ComponentLink3URL=https://datasheet.ciiva.com/912/cdbu0130l-reva791956-912530.pdf?src-supplier=Digikey, ComponentLink4Description=https://datasheet.ciiva.com/912/cdbu0130l-reva791956-912531.pdf?src-supplier=Digikey, ComponentLink4URL=https://datasheet.ciiva.com/912/cdbu0130l-reva791956-912531.pdf?src-supplier=Digikey, Item Type=Diodes, Manufacturer Part Number=CDBU0130L, Pricing="1=0.32, 10=0.201, 100=0.1069, 500=0.09036, 1000=0.0802, 2000=0.07933 (USD)", RoHS=Yes, Stock=48706, Supplier=Digikey
D2 D3 D4 D5 D6 D7 D8 D9: "TVS DIODE 5.5VWM 14.5VC SC706", LCSC Part Number=C840093, Manufacturer="Texas Instruments", ComponentLink1Description=https://datasheet.ciiva.com/6574/tpd4e1b06-6574671.pdf?src-supplier=Digikey, ComponentLink1URL=https://datasheet.ciiva.com/6574/tpd4e1b06-6574671.pdf?src-supplier=Digikey, ComponentLink2Description=https://datasheet.ciiva.com/12545/tpd4e1b06-224687-12545147.pdf?src-supplier=Mouser, ComponentLink2URL=https://datasheet.ciiva.com/12545/tpd4e1b06-224687-12545147.pdf?src-supplier=Mouser, Item Type=IC, Manufacturer Part Number=TPD4E1B06DCKR, Pricing="1=0.62, 10=0.453, 50=0.453, 100=0.31, 1000=0.236, 10000=0.195 (USD)", RoHS=Yes, Stock=26732, Supplier=Mouser
D10 D11: "TVS DIODE 5.5VWM 9.5VC 2X2SON", LCSC Part Number=C22427500, Manufacturer="Texas Instruments", Height=320um, Item Type=Diode, Length=600um, Manufacturer Part Number=ESD451DPLR, Pins=2, Pricing="1=0.2, 10=0.192, 50=0.192, 100=0.164, 1000=0.147, 10000=0.068 (USD)", RoHS=No, Supplier=Mouser, Thickness=300um, Width=300um
J3 J5 J7 J9 J11 J13 J15 J17: "Test Pad"
J4 J6 J8 J10 J14 J16 J18: "Sensor Connecting Pads"
J12: library part "EMG ELECTRODE 3 Pin", "Sensor Connecting Pads"
J20: "-40℃~+80℃ 15P Dual-sided contacts / top and bottom connection 0.5mm SMD,P=0.5mm,Surface Mount，Right Angle FFC, FPC (Flat Flexible) Connector Assemblies ROHS", LCSC Part Number=C19188796, Manufacturer=DIANWEI, Package="SMD,P=0.5mm,Surface Mount，Right Angle", ComponentLink1Description=LCSC, ComponentLink1URL=https://www.lcsc.com/product-detail/FFC-FPC-Flat-Flexible-Connector-Assemblies_DIANWEI-8-01A0-015200_C19188796.html?s_z=n_HC-FPC-05-20-15RLTAG, Item Type="FFC, FPC Connector", Manufacturer Part Number=8.01A0.015200
LED1: "LED BLUE CLEAR 0603 SMD", Case Code (Imperial)=0603, Case Code (Metric)=1608, Color=Red, Forward Current=30mA, Forward Voltage=2V, LCSC Part Number=C5197644, Lens Color=Colorless, Manufacturer="Wurth Electronics", Manufacturer Part Number=150060RS75000, Max Operating Temperature=85°C, Max Reverse Voltage (DC)=5V, Min Operating Temperature=-40°C, Package Quantity=1, Power Dissipation=72mW, Test Current=20mA, Case/Package=0603, ComponentLink1Description=https://datasheet.ciiva.com/29563/150060rs75000-29563040.pdf?src-supplier=Digikey, ComponentLink1URL=https://datasheet.ciiva.com/29563/150060rs75000-29563040.pdf?src-supplier=Digikey, ComponentLink2Description=https://datasheet.ciiva.com/29279/759428-da-01-en-chipled-0603-w-kl-rot-150060rs75000-29279196.pdf?src-supplier=Conrad, ComponentLink2URL=https://datasheet.ciiva.com/29279/759428-da-01-en-chipled-0603-w-kl-rot-150060rs75000-29279196.pdf?src-supplier=Conrad, Dominant Wavelength=625nm, Height=0.8mm, Item Type=LEDs, Length=1.6mm, Lens Size=0.7mm, Lens Style=Clear,Flat,Rectangular, Lens Transparency=Clear, Luminous Intensity=250mcd, Mounting Technology="Surface Mount", Packaging="Cut Tape", Reach SVHC Compliant=Unknown, Reverse Voltage=5V, RoHS=Yes, RoHS Compliant=Yes, Series=WL-SMCW, Stock=15900, Supplier=Rs, Viewing Angle=140°, Wavelength=625nm, Width=0.8mm
R1: library part RT0402BRD0710KL, "RES SMD 10K OHM 0.1% 1/16W 0402", LCSC Part Number=C190095, Manufacturer=Yageo, Supplier Part Number=1236728, Category="Chip SMD Resistors", ComponentLink1Description=https://datasheet.ciiva.com/12836/pyu-rt-1-to-0-05-rohs-l-4-12836454.pdf?src-supplier=Mouser, ComponentLink1URL=https://datasheet.ciiva.com/12836/pyu-rt-1-to-0-05-rohs-l-4-12836454.pdf?src-supplier=Mouser, Item Type=Resistor, Manufacturer Part Number=RT0402BRD0710KL, Pricing="10000=0.0218, 20000=0.0213, 30000=0.021, 50000=0.0206, 100000=0.0199 (USD)", RoHS=Yes, Stock=490000, Supplier="Future Electronics"
R2: library part RC0402FR-071ML, "RES 1M OHM 1% 1/16W 0402", Case Code (Imperial)=0402, Case Code (Metric)=1005, LCSC Part Number=C138033, Manufacturer=Yageo, Max Operating Temperature=155°C, Max Power Dissipation=63mW, Min Operating Temperature=-55°C, Resistance Tolerance=1%, Resistor Type="Thick Film", Supplier Part Number=311-1.00MLRCT-ND, Temperature Coefficient=100ppm/°C, Voltage Rating=50V, Case/Package=0402, Category="Chip SMD Resistors", ComponentLink1Description=https://datasheet.ciiva.com/11808/0900766b80c66297-11808125.pdf?src-supplier=Rs, ComponentLink1URL=https://datasheet.ciiva.com/11808/0900766b80c66297-11808125.pdf?src-supplier=Rs, ComponentLink2Description=https://datasheet.ciiva.com/46394/1018594-46394951.pdf?src-supplier=Element14, ComponentLink2URL=https://datasheet.ciiva.com/46394/1018594-46394951.pdf?src-supplier=Element14, ComponentLink3Description=https://datasheet.ciiva.com/7849/1018594-7849883.pdf?src-supplier=Element14, ComponentLink3URL=https://datasheet.ciiva.com/7849/1018594-7849883.pdf?src-supplier=Element14, ComponentLink4Description=https://datasheet.ciiva.com/7849/1018594-7849882.pdf?src-supplier=Element14, ComponentLink4URL=https://datasheet.ciiva.com/7849/1018594-7849882.pdf?src-supplier=Element14, ComponentLink5Description=https://datasheet.ciiva.com/16741/pyu-rc0402-51-rohs-l-6-r-16741081.pdf?src-supplier=Future+Electronics, ComponentLink5URL=https://datasheet.ciiva.com/16741/pyu-rc0402-51-rohs-l-6-r-16741081.pdf?src-supplier=Future+Electronics, Construction=Rectangular, Depth=0.5mm, Features="Moisture Resistant", Height=0.32mm, Item Type=Resistor, Lead Free=5697LeadFree, Length=1mm, Manufacturer Part Number=RC0402FR-071ML, Military Standard=Not, Number of Terminations=2, Packaging="Tape and Reel", Power Rating=63mW, Pricing="1=0.1, 10=0.015, 50=0.0088, 100=0.0073, 500=0.00488, 1000=0.00417, 5000=0.00297 (USD)", Reach SVHC Compliant=Unknown, RoHS=Yes, RoHS Compliant=Yes, Series=RC, Stock=6516, Supplier=Digikey, Technology="THICK FILM", Termination=SMD/SMT, Tolerance=1%, Voltage Rating (AC)=50V
R3 R5: library part RC0402FR-07470KL, "RES 470K OHM 1% 1/16W 0402", Case Code (Imperial)=0402, Case Code (Metric)=1005, LCSC Part Number=C137976, Manufacturer=Yageo, Max Operating Temperature=155°C, Max Power Dissipation=63mW, Min Operating Temperature=-55°C, Package Quantity=1, Power Rating=62.5mW, Resistance Tolerance=1%, Resistor Type="Thick Film", Supplier Part Number=7702467, Temperature Coefficient=100ppm/°C, Voltage Rating=50V, Case/Package=0402, Category="Chip SMD Resistors", ComponentLink1Description=https://datasheet.ciiva.com/11819/0900766b80c66297-11819514.pdf?src-supplier=Rs, ComponentLink1URL=https://datasheet.ciiva.com/11819/0900766b80c66297-11819514.pdf?src-supplier=Rs, ComponentLink2Description=https://datasheet.ciiva.com/46412/1018594-46412837.pdf?src-supplier=Element14, ComponentLink2URL=https://datasheet.ciiva.com/46412/1018594-46412837.pdf?src-supplier=Element14, ComponentLink3Description=https://datasheet.ciiva.com/2453/pyu-r-int-thick-7-2453434.pdf?src-supplier=Digi-Key, ComponentLink3URL=https://datasheet.ciiva.com/2453/pyu-r-int-thick-7-2453434.pdf?src-supplier=Digi-Key, ComponentLink4Description=https://datasheet.ciiva.com/2453/pyu-r-int-thick-7-2453435.pdf?src-supplier=Digi-Key, ComponentLink4URL=https://datasheet.ciiva.com/2453/pyu-r-int-thick-7-2453435.pdf?src-supplier=Digi-Key, ComponentLink5Description=https://datasheet.ciiva.com/2453/pyu-r-int-thick-7-2453433.pdf?src-supplier=Digi-Key, ComponentLink5URL=https://datasheet.ciiva.com/2453/pyu-r-int-thick-7-2453433.pdf?src-supplier=Digi-Key, ComponentLink6Description=https://datasheet.ciiva.com/7850/1018594-7850012.pdf?src-supplier=Element14, ComponentLink6URL=https://datasheet.ciiva.com/7850/1018594-7850012.pdf?src-supplier=Element14, ComponentLink7Description=https://datasheet.ciiva.com/7850/1018594-7850013.pdf?src-supplier=Element14, ComponentLink7URL=https://datasheet.ciiva.com/7850/1018594-7850013.pdf?src-supplier=Element14, ComponentLink8Description=https://datasheet.ciiva.com/15189/getdatasheetpartid-325138-15189462.pdf?src-supplier=Verical, ComponentLink8URL=https://datasheet.ciiva.com/15189/getdatasheetpartid-325138-15189462.pdf?src-supplier=Verical, Construction=Rectangular, Depth=0.5mm, Features="Moisture Resistant", Height=0.016inch, Item Type=Resistor, Lead Free=5697LeadFree, Length=0.039inch, Manufacturer Part Number=RC0402FR-07470KL, Military Standard=Not, Number of Terminations=2, Packaging="Tape and Reel", Pins=2, Pricing="10000=0.0009, 50000=0.0008, 300000=0.0008, 1000000=0.0007, 3000000=0.0007 (USD)", Reach SVHC Compliant=No, RoHS=Yes, RoHS Compliant=Yes, Series=RC, Stock=330000, Supplier="Future Electronics", Technology="THICK FILM", Termination=SMD/SMT, Tolerance=1%, Voltage Rating (AC)=50V, Voltage Rating (DC)=50V, Width=0.02inch
R4: library part RC0402FR-071KL, "RES 1K OHM 1% 1/16W 0402", Case Code (Imperial)=0402, Case Code (Metric)=1005, LCSC Part Number=C106235, Manufacturer=Yageo, Max Operating Temperature=155°C, Max Power Dissipation=63mW, Min Operating Temperature=-55°C, Power Rating=62.5mW, Resistance=1kR, Resistance Tolerance=1%, Resistor Type="Thick Film", Temperature Coefficient=100ppm/°C, Voltage Rating=50V, Case/Package=0402, Category="Chip SMD Resistors", ComponentLink1Description=https://datasheet.ciiva.com/11819/0900766b80c66297-11819477.pdf?src-supplier=RSComponents, ComponentLink1URL=https://datasheet.ciiva.com/11819/0900766b80c66297-11819477.pdf?src-supplier=RSComponents, ComponentLink2Description=https://datasheet.ciiva.com/7983/1018594-7983502.pdf?src-supplier=Element14, ComponentLink2URL=https://datasheet.ciiva.com/7983/1018594-7983502.pdf?src-supplier=Element14, ComponentLink3Description=https://datasheet.ciiva.com/22747/1018594-22747513.pdf?src-supplier=Element14, ComponentLink3URL=https://datasheet.ciiva.com/22747/1018594-22747513.pdf?src-supplier=Element14, ComponentLink4Description=https://datasheet.ciiva.com/12666/pyu-rc0402-51-rohs-l-6-r-12666741.pdf?src-supplier=Mouser, ComponentLink4URL=https://datasheet.ciiva.com/12666/pyu-rc0402-51-rohs-l-6-r-12666741.pdf?src-supplier=Mouser, ComponentLink5Description=https://datasheet.ciiva.com/7849/1018594-7849869.pdf?src-supplier=Element14, ComponentLink5URL=https://datasheet.ciiva.com/7849/1018594-7849869.pdf?src-supplier=Element14, ComponentLink6Description=https://datasheet.ciiva.com/7849/1018594-7849871.pdf?src-supplier=Element14, ComponentLink6URL=https://datasheet.ciiva.com/7849/1018594-7849871.pdf?src-supplier=Element14, ComponentLink7Description=https://datasheet.ciiva.com/17063/pyu-rc0402-51-rohs-l-6-r-17063193.pdf?src-supplier=Future+Electronics, ComponentLink7URL=https://datasheet.ciiva.com/17063/pyu-rc0402-51-rohs-l-6-r-17063193.pdf?src-supplier=Future+Electronics, Construction=Rectangular, Depth=0.5mm, Features="Moisture Resistant", Height=0.32mm, Item Type=Resistor, Lead Free="Lead Free", Length=1mm, Manufacturer Part Number=RC0402FR-071KL, Military Standard=Not, Number of Pins=2, Number of Terminations=2, Packaging="Tape and Reel", Pricing 1="10000=0.00085, 20000=0.00087, 40000=0.00084, 60000=0.00083, 80000=0.00079, 100000=0.00078, 1000000=0.00076 (USD)", Reach SVHC Compliant=Yes, RoHS=Yes, RoHS Compliant=Yes, Series=RC, Size Code=0402, Stock 1=13030000, Supplier 1=Avnet, Supplier Part Number 1=RC0402FR-071KL, Technology="THICK FILM", Termination=SMD/SMT, Tolerance=1%, Voltage Rating (DC)=50V, Width=0.5mm
R6 R7: library part RC0402FR-0710KL, "RES 10K OHM 1% 1/16W 0402", Case Code (Imperial)=0402, Case Code (Metric)=1005, LCSC Part Number=C60490, Manufacturer=Yageo, Max Operating Temperature=155°C, Max Power Dissipation=63mW, Min Operating Temperature=-55°C, Power Rating=62.5mW, Resistance=10kR, Resistance Tolerance=1%, Resistor Type="Thick Film", Supplier Part Number 1=603-RC0402FR-0710KL, Temperature Coefficient=100ppm/°C, Voltage Rating=50V, Case/Package=0402, Category="Chip SMD Resistors", ComponentLink1Description=https://datasheet.ciiva.com/7660/38568-7660787.pdf?src-supplier=Element14, ComponentLink1URL=https://datasheet.ciiva.com/7660/38568-7660787.pdf?src-supplier=Element14, ComponentLink2Description=https://datasheet.ciiva.com/7849/1686128-7849814.pdf?src-supplier=Element14, ComponentLink2URL=https://datasheet.ciiva.com/7849/1686128-7849814.pdf?src-supplier=Element14, ComponentLink3Description=https://datasheet.ciiva.com/7983/1018594-7983486.pdf?src-supplier=Element14, ComponentLink3URL=https://datasheet.ciiva.com/7983/1018594-7983486.pdf?src-supplier=Element14, ComponentLink4Description=https://datasheet.ciiva.com/22747/1018594-22747512.pdf?src-supplier=Element14, ComponentLink4URL=https://datasheet.ciiva.com/22747/1018594-22747512.pdf?src-supplier=Element14, ComponentLink5Description=https://datasheet.ciiva.com/12667/pyu-rc0402-51-rohs-l-6-r-12667067.pdf?src-supplier=Mouser, ComponentLink5URL=https://datasheet.ciiva.com/12667/pyu-rc0402-51-rohs-l-6-r-12667067.pdf?src-supplier=Mouser, ComponentLink6Description=https://datasheet.ciiva.com/7849/1784430-7849813.pdf?src-supplier=Element14, ComponentLink6URL=https://datasheet.ciiva.com/7849/1784430-7849813.pdf?src-supplier=Element14, ComponentLink7Description=https://datasheet.ciiva.com/7849/1784430-7849815.pdf?src-supplier=Element14, ComponentLink7URL=https://datasheet.ciiva.com/7849/1784430-7849815.pdf?src-supplier=Element14, Construction=Rectangular, Depth=0.5mm, Features="Moisture Resistant", Height=0.32mm, Lead Free="Lead Free", Lead Pitch=0.2mm, Length=1mm, Manufacturer Part Number=RC0402FR-0710KL, Military Standard=Not, Number of Pins=2, Number of Terminations=2, Packaging="Tape and Reel", Pricing 1="1=0.10000, 10=0.01400, 50=0.01400, 100=0.00500, 1000=0.00300, 10000=0.00200 (USD)", REACH SVHC="No SVHC", RoHS=Yes, RoHS Compliant=Yes, Series=RC, Stock 1=18648329, Supplier 1=Mouser, Termination=SMD/SMT, Tolerance=1%, Voltage Rating (DC)=50V, Width=0.5mm, Working Voltage=50V
SB1 SB2 SB3 SB4 SB5 SB6 SB7 SB8 SB9 SB10 SB11 SB12 SB13 SB14 SB15 SB16 SB17 SB18 SB19: "Solder Bridge ON", Manufacturer Part Number="Solder Bridge", Item Type="Solder Bridge"
SW1 SW2 SW3 SW4: "SWITCH TACTILE SPST-NO 0.05A 16V", LCSC Part Number=C221896, Manufacturer="ITT C&K", ComponentLink1Description=https://datasheet.ciiva.com/18514/pts810-4mar13-18514061.pdf?src-supplier=Digikey, ComponentLink1URL=https://datasheet.ciiva.com/18514/pts810-4mar13-18514061.pdf?src-supplier=Digikey, ComponentLink2Description=https://datasheet.ciiva.com/18514/pts810-4mar13-18514062.pdf?src-supplier=Digikey, ComponentLink2URL=https://datasheet.ciiva.com/18514/pts810-4mar13-18514062.pdf?src-supplier=Digikey, ComponentLink3Description=https://datasheet.ciiva.com/18514/pts810-4mar13-18514063.pdf?src-supplier=Digikey, ComponentLink3URL=https://datasheet.ciiva.com/18514/pts810-4mar13-18514063.pdf?src-supplier=Digikey, Item Type="Tactile Switches", Lead Free=5697LeadFree, Manufacturer Part Number=PTS810SJK250SMTRLFS, Number of Positions=2NUMBER, RoHS=Yes, Stock=100, Supplier=Rs
TP3: "Wire Connecting Pad", Item Type="Test Point", Manufacturer Part Number="2 Test Pad"
TP4 TP5 TP6 TP7: "Test Point ON", Item Type="Test Point", Manufacturer Part Number="TEST POINT 0.5mm Dia"